# Altium PCB Industrial_IOT_Dev_Brd-v2.0.PcbDoc (part 5 of 5)
Units mil, origin at the board's own origin, x right, y up, seen from the top; angles counter-clockwise.
Board outline 3543.31 x 4724.41 mil, 2 copper layers (Top Layer, Bottom Layer), stack 61.889 mil thick; 159 components, 96 nets, 479 pads, 141 vias.
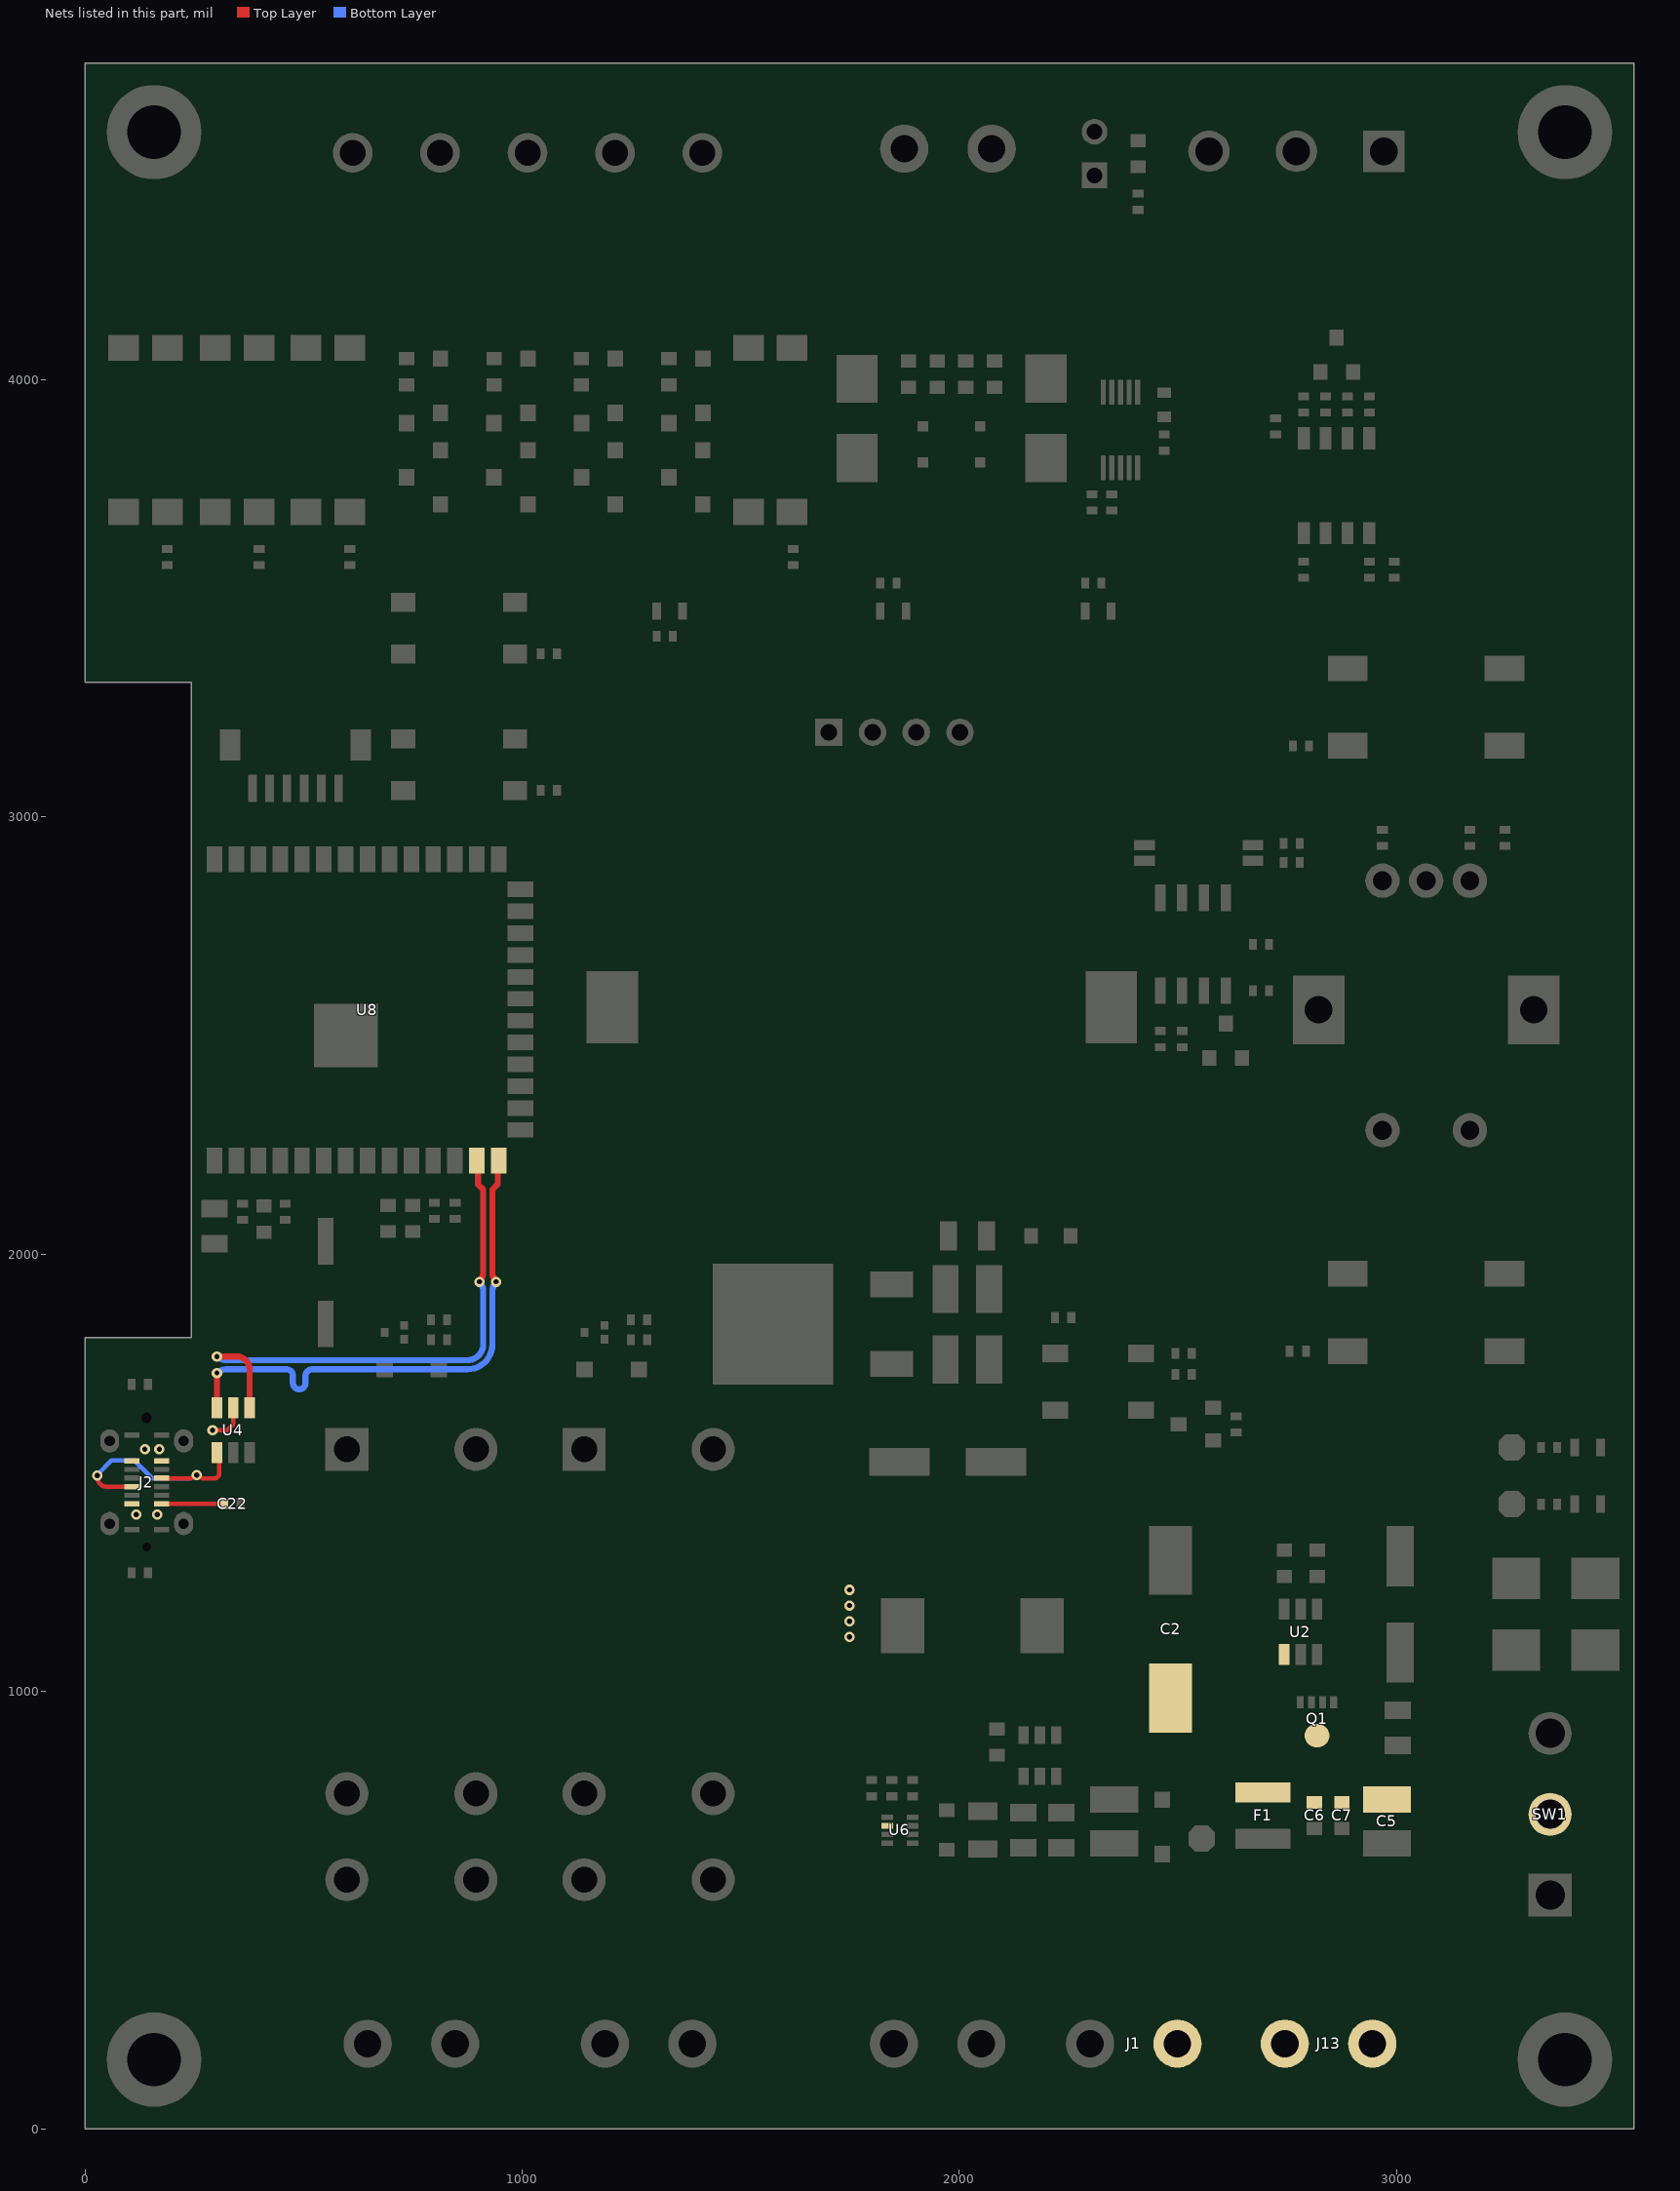
[diagram p3: the nets of this part, all layers, seen from the top]

## Via types
v1: diameter 23.62, hole 11.81, Top Layer to Bottom Layer, tented both sides, 141 vias

## Nets (pads, with @x,y where several pads share a name; then routed paths per layer and width w, separated by ;. In a path a pad name is that pad's centre, name@x,y a point inside that pad or via, vN(x,y) a via of type N, cw(c..) or ccw(c..) an arc to the next point about the centre after c; other vN are vias at no path point) (continued)
TYPEC_D_P: J2.A6 J2.B6 U4.1 | length 551
  Top Layer w10: v1(27.72,1494.02) 30.63,1480.38 ccw(c50.31,1489.14) 50.35,1467.6 53.59,1467.6 106.14,1467.6 J2.A6@106.97,1468.43 ; J2.B6@175.08,1488.11 ccw(c177.27,1490.3) 177.27,1487.2 189.02,1487.2 ccw(c190.07,1488.26) 190.07,1486.77 237.8,1486.77 ccw(c237.8,1500.96) 247.83,1490.92 249.38,1492.47 cw(c255.67,1486.18) v1(255.67,1495.08) cw(c255.67,1486.18) 261.96,1492.47 263.51,1490.92 ccw(c273.55,1500.96) 273.55,1486.77 294.45,1486.77 ccw(c294.45,1499.23) 306.91,1499.23 306.91,1540.48 U4.1@301.69,1545.69
  Bottom Layer w10: v1(27.72,1494.02) 27.72,1495.51 60.21,1528 112.6,1528 153.83,1486.77 237.8,1486.77 ccw(c237.8,1500.96) 247.83,1490.92 249.38,1492.47 cw(c255.67,1486.18) v1(255.67,1495.08)
TYPEC_N: U4.4 U8.13 | length 1242.5
  Top Layer w14: v1(301.69,1766) 347.19,1766 cw(c347.19,1736.69) 360.24,1762.93 cw(c347.19,1736.69) 373.43,1749.74 cw(c347.19,1736.69) 376.5,1736.69 U4.4@376.5,1648.84 ; U8.13@896.42,2214.66 898.82,2212.25 898.82,2159.82 910.67,2147.97 910.67,1956.41 cw(c889.42,1956.41) 904.45,1941.39 ccw(c908.89,1936.94) v1(902.6,1936.94)
  Bottom Layer w14: v1(301.69,1766) cw(c301.69,1759.71) 306.13,1764.16 ccw(c321.76,1779.78) 321.76,1757.69 452.42,1757.69 600,1757.69 874.64,1757.69 ccw(c874.64,1793.97) 910.92,1793.97 910.92,1916.88 ccw(c888.83,1916.88) 904.45,1932.5 cw(c908.89,1936.94) v1(902.6,1936.94)
TYPEC_P: U4.6 U8.14 | length 1242.3
  Top Layer w14: U4.6@301.69,1648.84 v1(301.69,1728.38) ; v1(940.23,1936.94) ccw(c933.94,1936.94) 938.39,1941.39 cw(c954.6,1957.6) 931.67,1957.6 931.67,2147.66 944.01,2160 944.01,2212.25 U8.14@946.42,2214.66
  Bottom Layer w14: v1(301.69,1728.38) ccw(c301.69,1734.66) 306.13,1730.21 cw(c321.76,1714.6) 321.76,1736.69 425,1736.69 461,1736.69 cw(c461,1722.19) 475.5,1722.19 475.5,1705.6 ccw(c490,1705.6) 504.5,1705.6 504.5,1722.19 cw(c519,1722.19) 519,1736.69 543.89,1736.69 874.64,1736.69 ccw(c874.64,1793.97) 931.92,1793.97 931.92,1916.88 cw(c954.01,1916.88) 938.39,1932.5 ccw(c933.94,1936.94) v1(940.23,1936.94)
VBUS-TYPEC: C22.1 J2.A4 J2.A9 J2.B4 J2.B9 U4.5 U6.6 | length 234.7
  Top Layer w10: J2.B9@175.08,1429.06 C22.1@318.63,1429.06 ; v1(291.69,1597.27) 325.74,1597.27 339.1,1610.63 U4.5@339.1,1648.84
  other v1: 1749.03,1124.37 1749.03,1160.37 1749.03,1196.37 1749.03,1232.37 116.97,1404.78 165.08,1404.78 136.97,1553.76 170.08,1553.76
VCC: J1.1 J13.1 J13.2 SW1.2
VIN: C2.1 C5.2 C6.2 C7.2 F1.1 Q1.5 U2.4
pads on no net: J2.A8 J2.B8 J2.MH J3.MP1 J3.MP2 LED5.2 SW1.1 U6.8 U8.15 U8.16 U8.17 U8.18 U8.19 U8.24 U8.25 U8.26 U8.28 U8.29 U8.30 U10.7 X1.2 X1.3

## Polygon pours and split planes (outlines as drawn)
5V on Top Layer "5V_L01_P130" (solid, pour order 130): 1773.72,1809.58 1773.72,1483.47 1794.2,1463 1931.99,1463 1952,1483.01 1952,1640.96 2007,1695.96 2007,1805.95 1985.95,1827 1791.15,1827
3V3 on Top Layer "3V3_L01_P136" (solid, pour order 136): 1240,3507.82 cw(c1260,3507.82) 1260,3527.82 1639.06,3527.82 ccw(c1639.06,3541.26) 1652.51,3541.26 1652.51,3572.7 ccw(c1640.21,3572.7) 1640.2,3585 175.7,3585 ccw(c175.7,3569.3) 160,3569.3 160,3544.34 ccw(c176.52,3544.34) 176.52,3527.82 1152.18,3527.82 cw(c1152.18,3500) 1180,3500 1180,3340 ccw(c1221.41,3340) 1221.41,3298.59 1732.91,3298.59 cw(c1732.91,3271.5) 1760,3271.5 1760,3162.44 ccw(c1778.5,3162.44) 1778.5,3143.94 1823.68,3143.94 ccw(c1823.68,3167.28) 1847.02,3167.28 1847.02,3333.42 ccw(c1819.88,3333.42) 1819.88,3360.56 1260,3360.56 cw(c1260,3380.56) 1240,3380.56
NetC9_2 on Top Layer "NETC9_2_L01_P114" (solid, pour order 114): 1820.99,874.78 1836.75,859.01 1942.16,858.84 2020.63,780.37 2020.64,702.76 2263.31,702.76 2263.31,746.76 2252.23,757.83 2182.8,757.83 2158.5,782.13 2158.5,825.2 2053.51,825.2 2020,858.71 2020,1239.55 2002.41,1257.14 1837.03,1257.14 1820.98,1241.09
3V3 on Top Layer "3V3_L01_P133" (solid, pour order 133): 2030,2077.53 2048.47,2096 2194,2096 2209.37,2080.63 2209.37,2013.3 2191.07,1995 2047.13,1995 2030,2012.13
GND on Top Layer "GND_L01_P132" (solid, remove dead copper, pour order 132): 0,1258.75 1720,1258.75 1720,94.29 3543.31,94.29 3543.31,4724.41 0,4724.41 0,3308.25 243.39,3308.25 243.39,1809.66 0,1809.66
NetC19_2 on Top Layer "NETC19_2_L01_P117" (solid, pour order 117): 1773.72,2077.38 1792.34,2096 1987.06,2096 2007,2076.06 2007,1873.29 1985.71,1852 1793.4,1852 1773.72,1871.67
NetC1_1 on Top Layer "NETC1_1_L01_P115" (solid, pour order 115): 2200,1257.14 2247.86,1257.14 2265,1240 2265,969.95 2252.23,957.18 2203.72,957.18 2195.91,949.37 2195.91,880.32 2172.28,880.32 2172.28,948.72 2163.82,957.18 2114.59,957.18 2101,970.77 2101,1239 2119.14,1257.14
24V on Top Layer "24V_L01_P113" (solid, pour order 113): 2299.1,757.83 2285,771.93 2173.52,771.93 2172.28,773.16 2172.28,825.2 2303.2,825.2 2314.78,836.78 2576.22,836.78 2595.56,817.44 2595.56,721.35 2621.79,695.12 2755.54,695.12 2765.1,685.56 2765.1,618.2 2756.18,609.29 2514,609.29 2503,620.29 2503,706.1 2486.34,722.76 2299.1,722.76
NetC3_1 on Top Layer "NETC3_1_L01_P112" (solid, pour order 112): 2856.53,1159.29 2856.53,1287.96 2836.24,1308.25 2725.84,1308.25 2725.84,1353 2901.42,1353 2924.42,1330 2924.42,1175.58 2942,1157.9 3346.82,1157.9 3368,1136.72 3368,995 3427,936 3427,815 3408.12,796.12 3165.88,796.12 3149,813 3149,917 3129,937 2929.61,937 2905.2,961.41 2797.08,961.41 2797.08,1051.81 2805.94,1060.67 2805.94,1108.7
VIN on Top Layer "VIN_L01_P111" (solid, pour order 111): 2755.55,1108.7 2408.7,1108.7 2387,1087 2387,875 2404,858 2600.91,858 2616,842.91 2616,731.11 2631.1,716.01 3050.07,716.01 3065.07,731.01 3065.07,788.93 3049,805 2927.65,805 2913,819.65 2913,920 2896,937 2765.95,937 2755.55,947.4
3V3 on Bottom Layer "3V3_L02_P134" (solid, pour order 134): 2600,1657.79 2600,1632.54 ccw(c2630.9,1632.54) 2630.9,1601.64 3274.04,1601.64 cw(c3274.04,1582.5) 3293.01,1579.95 3293.68,1530.03 cw(c3273.92,1529.77) 3273.91,1510 2557.43,1510 cw(c2557.43,1547.08) 2520.36,1547.08 2520.36,1944.64 ccw(c2465,1944.64) 2465,2000 319.8,2000 cw(c319.8,2054.8) 265,2054.8 265,3357 265,3500 265,3582.72 cw(c297.28,3582.72) 297.28,3615 335,3615 cw(c335,3585.87) 364.13,3585.87 364.13,2155.34 ccw(c423.47,2155.33) 423.47,2096 2574,2096 cw(c2574,2070) 2600,2070
VBUS-TYPEC on Bottom Layer "VBUS-TYPEC_L02_P124" (solid, pour order 124): 94,1349.04 ccw(c123.87,1349.04) 123.87,1319.17 1685.98,1319.17 cw(c1685.98,1285.15) 1720,1285.15 1720,1087 1779,1087 1779,1405 ccw(c1740,1405) 1740,1444 415,1444 338.9,1444.21 cw(c338.9,1469.22) 313.9,1469.22 313.9,1503.06 313.9,1616.93 ccw(c297.77,1616.93) 297.77,1633.06 112.72,1633.06 ccw(c112.72,1614.34) 94,1614.34
GND on Bottom Layer "GND_L02_P131" (solid, remove dead copper, pour order 131): 78.01,1330.4 78.01,1546.18 0,1546.18 0,1809.66 243.39,1809.66 243.39,3308.25 0,3308.25 0,4724.41 3543.31,4724.41 3543.31,814.95 3540.82,817.44 2455.8,817.44 2408.61,770.25 2408.61,94.29 1720,94.29 1720,1275.84 1665.44,1330.4
5V on Bottom Layer "5V_L02_P126" (solid, pour order 126): 2236,1814 2281,1814 2296.36,1814 cw(c2296.36,1780.36) 2330,1780.36 2330,1640.63 cw(c2297.13,1640.63) 2297.13,1607.77 2242.77,1607.77 1999.77,1607.77 ccw(c1999.77,1559) 1951,1559 1951,1055 1951,1007 1951,933.39 1860,842.39 1860,573 cw(c1820,573) 1820,533 1762,533 cw(c1762,572) 1723,572 1723,1066.45 1786.45,1066.45 ccw(c1786.45,1079.42) 1799.42,1079.42 1799.3,1174.63 1799.3,1254.74 1799.3,1411.18 ccw(c1747.31,1411.18) 1747.31,1463.17 ccw(c1749.22,1415.12) 1744.79,1463 817,1463 cw(c817,1505) 775,1505 775,1610 cw(c813.02,1610) 813.03,1648.03 1002.03,1648.03 1168,1814
VCC on Bottom Layer "VCC_L02_P110" (solid, pour order 110): 3483.89,796.12 cw(c3483.89,760) 3520,760 3520,660 cw(c3488.83,660) 3488.83,628.83 3445.83,628.83 3084.83,628.83 ccw(c3084.83,589.31) 3045.31,589.31 3045.31,155.31 cw(c2986.93,155.31) 2986.92,96.92 2489.35,96.92 cw(c2488.04,155.96) 2429,154.64 2429,738.77 cw(c2486.34,738.77) 2486.34,796.12

## Other copper
Top Layer:
  rectangle net NetC1_1: 2172.28,880.32 2195.91,949.37
  rectangle net NetR1_2: 2291.24,3769.84 2329.09,3826.93
  rectangle net LED: 2562.26,1620.64 2654.89,1700
  rectangle net 3V3: 2562.26,1535 2654.89,1601.64
  rectangle net NetC9_2: 2045,810 2153.11,825.2
  rectangle net 5V: 1821.97,666.62 1906.22,679.22
  region net VBUS-TYPEC: 192.21,1434.96 89.84,1434.96 89.84,1404.01 192.21,1404.01
  rectangle net VBUS-TYPEC: 89.84,1521.58 192.21,1538.02
  rectangle net NetR17_1: 1884.59,712.29 1900.9,761.5
  rectangle net NetC9_2: 2020.63,702.76 2263.31,742.76
  rectangle net NetC3_1: 2725.84,1308.25 2836.24,1338.25
  rectangle net NetC17_1: 2805.94,1163.82 2830.35,1263.25
  rectangle net NetR6_2: 2731.14,1163.82 2755.54,1263.25
  rectangle net NetD1_1: 3424.23,1073 3487,1274
  rectangle net NetC3_1: 2805.94,961.41 2864.79,1108.7
  rectangle net VIN: 2717,937 2755.55,1108.7
  rectangle net NetQ1_4: 2771.49,961.41 2788.02,1084.69
  rectangle net 3V3: 2452.72,3865.91 2484.21,3927.25
  rectangle net 3V3-FIL: 2407.84,3958.75 2484.21,3982.37
  region net VBUS-TYPEC: 1765.03,1256.77 1771.62,1250.19 1771.62,1232.37 1771.62,713.63 1786.35,698.9 1848.35,698.9 1848.35,686.31 1732.4,686.31 1726.44,692.26 1726.44,1250.73 1732.49,1256.77
  region net 24V: 2303.2,825.2 2172.28,825.2 2172.28,785.83 2186.51,771.61 2284.68,771.61 2303.2,790.13
  region net NetC9_2: 2158.5,825.2 2158.5,780.4 2181.07,757.83 2252.23,757.83 2263.31,746.76 2263.31,702.76 2020.63,702.76 2020.63,780.37 2053.51,825.2
  region net 3V3: 363.7,2170.13 372.62,2170.13 372.62,2106.5 326.42,2106.5 326.42,2084 266.42,2084 266.42,2170.13 329.13,2170.13 329.13,2300 363.7,2300
  region net RLY1_COM: 928,643 932.83,643 942.29,641.12 951.21,637.42 959.24,632.06 966.06,625.24 971.42,617.21 975.12,608.29 976.49,601.37 977,594 977,425 976.9,419.68 974.63,409.29 970.38,399.53 964.31,390.8 956.65,383.42 947.69,377.67 937.79,373.78 929.85,372.36 922,372 791.45,372 787.05,371.78 778.42,370.07 770.3,366.7 762.98,361.81 756.76,355.59 751.87,348.27 748.5,340.15 746.79,331.52 746.57,327.12 746.57,221 746.57,148.91 746.57,143.54 744.47,132.98 740.35,123.04 734.38,114.1 726.77,106.49 717.82,100.51 707.88,96.39 697.33,94.29 691.95,94.29 570.47,94.29 560.3,96.32 550.71,100.29 542.09,106.05 534.76,113.38 528.99,122.01 525.02,131.59 523,141.76 523,146.95 523,601.88 523,605.93 524.58,613.87 527.68,621.36 532.18,628.09 537.91,633.82 544.64,638.32 552.13,641.42 560.07,643 564.12,643
  region net RLY2_COM: 1470.62,643 1475.44,643 1484.91,641.12 1493.83,637.42 1501.85,632.06 1508.68,625.24 1514.04,617.21 1517.73,608.29 1519.11,601.37 1519.62,594 1519.62,425 1519.52,419.68 1517.25,409.29 1513,399.53 1506.92,390.8 1499.26,383.42 1490.31,377.67 1480.41,373.78 1472.47,372.36 1464.62,372 1334.07,372 1329.67,371.78 1321.04,370.07 1312.91,366.7 1305.6,361.81 1299.38,355.59 1294.49,348.27 1291.12,340.15 1289.41,331.52 1289.19,327.12 1289.19,221 1289.19,148.91 1289.19,143.54 1287.09,132.98 1282.97,123.04 1276.99,114.1 1269.39,106.49 1260.44,100.51 1250.5,96.39 1239.95,94.29 1234.57,94.29 1113.09,94.29 1102.92,96.32 1093.33,100.29 1084.71,106.05 1077.37,113.38 1071.61,122.01 1067.64,131.59 1065.62,141.76 1065.62,146.95 1065.62,601.88 1065.62,605.93 1067.2,613.87 1070.3,621.36 1074.8,628.09 1080.53,633.82 1087.26,638.32 1094.74,641.42 1102.69,643 1106.74,643
  region net 5V: 1806.97,631.94 1870.33,631.94 1870.33,629.49 1870.33,628.89 1872.08,620.11 1877.05,612.67 1877.3,612.42 1884.74,607.45 1893.52,605.71 1902.3,607.45 1909.74,612.42 1914.71,619.87 1915.95,626.12 1921.22,631.94 1921.22,665.91 1936.25,665.91 1936.25,569.51 1928.74,562 1737,562 1726.44,572.56 1726.44,660.54 1731.68,665.27 1732.47,665.91 1806.97,665.91
  region net 5V: 1796.71,679.22 1731.68,679.22 1726.44,673.98 1726.44,610 1733.44,603 1796.73,603 1806.97,613.24 1806.97,660.7 1812.89,666.62 1835.16,666.62 1835.16,679.22
  region net 5V: 1881.95,679.22 1928.74,679.22 1942,665.96 1942,575.26 1928.74,562 1918.19,572.56 1916.07,572.56 1916.07,660.51 1909.97,666.62 1879.84,666.62 1881.95,668.73
  region net VBUS-TYPEC: 147.95,1432.83 192.21,1432.83 192.21,1401.54 192.21,1399 190.26,1394.31 186.67,1390.72 181.98,1388.78 103.14,1388.78 100.5,1388.78 95.61,1390.8 91.87,1394.55 89.84,1399.43 89.84,1428.98 93.1,1432.83 134.1,1432.83 134.1,1434.96 147.95,1434.96
  region net VBUS-TYPEC: 186.44,1565.73 190.18,1561.99 192.21,1557.1 192.21,1526.53 189.38,1523.7 147.95,1523.7 147.95,1521.58 134.1,1521.58 134.1,1523.7 89.84,1523.7 89.84,1555 89.84,1557.54 91.79,1562.23 95.38,1565.82 100.06,1567.76 178.91,1567.76 181.55,1567.76
  region net 5V-PWR: 1936.25,686.31 1953.38,669.18 1953.38,614.74 1965.12,603 2095,603 2101.1,609.1 2101.1,675.33 2090.12,686.31 1979.71,686.31 1967.11,698.9 1876.43,698.9 1864.1,711.24 1864.1,763.19 1858.28,769 1787,769 1780,762 1780,716.32 1790.33,705.99 1851.62,705.99 1871.3,686.31
  region: 3543.31,4501.18 3543.31,4724.41 3320.08,4724.41 ccw(c3385.46,4566.56) 3214.61,4566.56 ccw(c3385.46,4566.56) 3385.46,4395.71 ccw(c3385.46,4566.56)
  region: 223.23,4724.41 0,4724.41 0,4501.18 ccw(c157.85,4566.56) 157.85,4395.71 ccw(c157.85,4566.56) 328.7,4566.56 ccw(c157.85,4566.56)
  region: 0,223.23 0,0 223.23,0 ccw(c157.85,157.85) 328.7,157.85 ccw(c157.85,157.85) 157.85,328.7 ccw(c157.85,157.85)
  region: 3320.08,0 3543.31,0 3543.31,223.23 ccw(c3385.46,157.85) 3385.46,328.7 ccw(c3385.46,157.85) 3214.61,157.85 ccw(c3385.46,157.85)
Bottom Layer:
  region net RLY2_NO: 1545.74,857.73 1556.48,853.29 1566.13,846.83 1574.35,838.62 1580.8,828.96 1585.25,818.23 1587.52,806.83 1587.52,801.02 1587.52,148.52 1587.51,148.52 1587.51,143.24 1585.46,132.91 1581.42,123.17 1575.57,114.4 1568.11,106.95 1559.35,101.09 1549.61,97.06 1539.27,95 1534,95 1402.04,94.29 1359.78,94.29 1356.15,94.29 1349.05,95.71 1342.36,98.48 1336.33,102.5 1331.21,107.63 1327.19,113.65 1324.41,120.34 1323,127.45 1323,131.07 1323,287.19 1322.84,290.5 1321.54,297 1319.01,303.13 1315.33,308.64 1310.64,313.33 1305.13,317.01 1299,319.54 1292.5,320.84 1289.19,321 1259.48,321 1182.99,320.85 1175.44,320.84 1167.57,321.82 1166.82,321.97 1161.45,324.2 1156.61,327.43 1152.49,331.55 1149.26,336.38 1147.03,341.76 1145.9,347.47 1145.9,480.74 1150.26,480.74 1167.38,484.15 1183.5,490.82 1198.01,500.52 1210.34,512.86 1220.04,527.37 1226.72,543.49 1230.12,560.6 1230.12,578.05 1226.72,595.16 1220.04,611.29 1210.34,625.79 1198.01,638.13 1183.5,647.83 1167.38,654.5 1150.26,657.91 1132.81,657.91 1114.38,657.91 1109.55,657.81 1100.04,659.51 1091.04,663.04 1082.9,668.25 1075.94,674.95 1070.42,682.88 1066.55,691.73 1064.48,701.17 1064.38,706 1064.38,815.23 1066.29,824.82 1070.04,833.86 1075.47,841.99 1082.39,848.91 1090.52,854.35 1099.56,858.09 1109.16,860 1534.35,860 hole: 1445.56,657.91 1428.11,657.91 1411,654.5 1394.88,647.83 1380.37,638.13 1368.03,625.79 1358.34,611.29 1351.66,595.16 1348.25,578.05 1348.25,560.6 1351.66,543.49 1358.34,527.37 1368.03,512.86 1380.37,500.52 1394.88,490.82 1411,484.15 1428.11,480.74 1445.56,480.74 1462.68,484.15 1478.8,490.82 1493.31,500.52 1505.64,512.86 1515.34,527.37 1522.02,543.49 1525.42,560.6 1525.42,578.05 1522.02,595.16 1515.34,611.29 1505.64,625.79 1493.31,638.13 1478.8,647.83 1462.68,654.5
  region net RLY1_NO: 924.67,860 929.06,860 937.67,858.29 945.78,854.93 953.08,850.05 959.29,843.85 964.16,836.55 967.52,828.44 968.64,822.81 969.23,815.44 969.23,686.36 968.02,680.27 965.64,674.52 962.19,669.35 957.79,664.96 952.62,661.5 946.88,659.12 940.78,657.91 835.96,657.91 832.99,657.76 827.16,656.6 821.67,654.33 816.72,651.03 812.52,646.82 809.22,641.88 806.94,636.39 805.78,630.56 805.64,627.59 805.64,557.47 805.64,503.36 806.1,498.64 809.72,489.9 816.41,483.21 825.14,479.6 829.87,479.13 930.87,479.13 934.65,479.13 942.06,477.66 949.04,474.76 955.33,470.57 960.67,465.22 964.87,458.94 967.76,451.96 968.5,448.23 969.23,440.77 969.23,161.84 969.23,155.19 966.64,142.14 961.55,129.84 954.15,118.78 944.75,109.37 933.68,101.98 921.39,96.89 908.34,94.29 901.69,94.29 817.16,94.29 810.21,94.29 796.57,97.01 783.72,102.33 772.16,110.05 762.33,119.88 754.6,131.45 749.28,144.29 746.57,157.93 746.57,164.88 746.57,220.42 746.57,284.92 746.27,291.1 743.85,303.23 739.12,314.66 732.25,324.94 723.51,333.68 713.23,340.55 701.8,345.28 690.86,347.46 689.68,347.7 683.5,348 683.49,348 496.71,348 486.32,350.07 476.54,354.12 467.73,360 460.24,367.49 454.36,376.29 450.31,386.08 448.24,396.46 448.24,401.76 448.24,815.23 448.24,819.64 449.96,828.29 453.34,836.43 458.24,843.77 464.47,850 471.81,854.9 479.95,858.28 488.6,860 493.01,860 hole: 607.64,657.91 590.19,657.91 573.08,654.5 556.96,647.83 542.45,638.13 530.11,625.79 520.42,611.29 513.74,595.16 510.34,578.05 510.34,560.6 513.74,543.49 520.42,527.37 530.11,512.86 542.45,500.52 556.96,490.82 573.08,484.15 590.19,480.74 607.64,480.74 624.76,484.15 640.88,490.82 655.39,500.52 667.73,512.86 677.42,527.37 684.1,543.49 687.5,560.6 687.5,578.05 684.1,595.16 677.42,611.29 667.73,625.79 655.39,638.13 640.88,647.83 624.76,654.5
  pour cut-out: 1052.95,569.33 ccw(c1141.54,569.33) 1141.54,480.74 ccw(c1141.54,569.33) 1230.12,569.33 ccw(c1141.54,569.33) 1141.54,657.91 ccw(c1141.54,569.33)
  pour cut-out: 1348.25,569.33 ccw(c1436.84,569.33) 1436.84,480.74 ccw(c1436.84,569.33) 1525.42,569.33 ccw(c1436.84,569.33) 1436.84,657.91 ccw(c1436.84,569.33)
  pour cut-out: 510.34,569.33 ccw(c598.92,569.33) 598.92,480.74 ccw(c598.92,569.33) 687.5,569.33 ccw(c598.92,569.33) 598.92,657.91 ccw(c598.92,569.33)
  region: 3543.31,4501.18 3543.31,4724.41 3320.08,4724.41 ccw(c3385.46,4566.56) 3214.61,4566.56 ccw(c3385.46,4566.56) 3385.46,4395.71 ccw(c3385.46,4566.56)
  region: 223.23,4724.41 0,4724.41 0,4501.18 ccw(c157.85,4566.56) 157.85,4395.71 ccw(c157.85,4566.56) 328.7,4566.56 ccw(c157.85,4566.56)
  region: 0,223.23 0,0 223.23,0 ccw(c157.85,157.85) 328.7,157.85 ccw(c157.85,157.85) 157.85,328.7 ccw(c157.85,157.85)
  region: 3320.08,0 3543.31,0 3543.31,223.23 ccw(c3385.46,157.85) 3385.46,328.7 ccw(c3385.46,157.85) 3214.61,157.85 ccw(c3385.46,157.85)
Multi-Layer:
  pour cut-out: 3543.05,4724.41 3228.11,4724.41 3227.61,4724.9 ccw(c3384.96,4567.55) 3162.43,4567.55 ccw(c3384.97,4567.55) 3384.97,4345.02 ccw(c3391.05,4552.36) 3538.62,4406.58 3543.54,4423.32
  pour cut-out: 0,4724.15 0,4409.21 -0.49,4408.71 ccw(c156.86,4566.07) 156.86,4343.53 ccw(c156.86,4566.07) 379.39,4566.07 ccw(c172.05,4572.15) 317.83,4719.72 301.09,4724.64
  pour cut-out: 0.26,0 315.2,0 315.7,-0.49 ccw(c158.34,156.86) 380.88,156.86 ccw(c158.34,156.86) 158.34,379.39 ccw(c152.26,172.05) 4.69,317.83 -0.23,301.09
  pour cut-out: 1639.51,1232.37 cw(c1639.51,1151.88) 1720,1151.88 1720,0 100,0 cw(c100,100) 0,100 0,1232.37
  pour cut-out: 3543.31,0.26 3543.31,315.2 3543.8,315.7 ccw(c3386.45,158.34) 3386.45,380.87 ccw(c3386.45,158.34) 3163.92,158.34 ccw(c3371.26,152.26) 3225.48,4.69 3242.22,-0.23

## Silkscreen, mask and mechanical layers (free items; w line width, h text height)
Top Overlay:
  lines w5: 2966.54,3944.15 3030,3944.15 ; 2760,3901.91 2966.54,3901.91 2966.54,3986.38 2760,3986.38 2760,3901.91 ; 3030,3875 3240,3875 3240,4010 3030,4010 3030,3875
  text "D3" at 1068.9,4306.58 h78.74 r180
  text "GND" at 2656.35,4306.58 h78.74 r180
  text "GND" at 689.96,4305.93 h78.74 r180
  text "D4" at 869.48,4305.93 h78.74 r180
  text "D2" at 1264.31,4305.93 h78.74 r180
  text "D1" at 1464.31,4305.93 h78.74 r180
  text "A2" at 1902.62,4305.93 h78.74 r180
  text "A1" at 2160.61,4305.93 h78.74 r180
  text "B" at 2829.7,4305.93 h78.74 r180
  text "A" at 3027.69,4305.93 h78.74 r180
  text "DIGITAL INPUT" at 1464.31,4220.65 h100 r180
  text "ANALOG" at 2160.61,4219.57 h100 r180
  text "RS-485" at 3027.69,4219.57 h100 r180
  text "RESET" at 700.41,3539.48 h78.74
  text "RL2" at 2122.97,3438.7 h78.74
  text "PWR" at 1117.22,3437.61 h78.74
  text "RL1" at 1658.54,3438.21 h78.74
  text "OLED" at 1636.5,3271.17 h78.74
  text "VOLTLINK" at 309.73,3227.37 h78.74
  text "BOOT" at 700.32,3227.37 h78.74
  text "SELECT" at 2911.4,3039.8 h78.74
  text "ENCODER" at 2831.51,2153.44 h78.74
  text "BACK" at 2910.29,1651.49 h78.74
  text "RGB" at 2211.9,1524.22 h78.74
  text "3V3" at 3055.28,1521.89 h78.74
  text "5V0" at 3054.85,1394.32 h78.74
  text "24V" at 2574.4,733.15 h78.74 r90
  text "CAUTION" at 166.08,533.74 h120 r90
  text "DC POWER IN" at 1783.01,498.74 h100
  text "POWER SW" at 3184.61,463.83 h78.74 r90
  text "HIGH VOLTAGE" at 267.81,431.41 h120 r90
  text "GND" at 1787.5,427.25 h78.74
  text "GND" at 1987.5,427.25 h78.74
  text "GND" at 2236.1,427.25 h78.74
  text "COM" at 545.78,414.59 h78.74
  text "NO1" at 774.78,414.59 h78.74
  text "COM" at 1088.4,414.59 h78.74
  text "NO2" at 1312.73,414.59 h78.74
  text "24V" at 2428.64,414.59 h78.74
  text "24V" at 2674.27,414.59 h78.74
  text "24V" at 2874.27,414.59 h78.74
Bottom Overlay:
  drawing of 2 lines, arcs and shapes, not listed
  text "CAUTION" at 1108.36,1143.92 h120
  text "HIGH VOLTAGE" at 1210.69,1042.19 h120
  text "Rev-v2.0" at 40.04,605.07 h60 r270
  text "IOT-DEV-BOARD" at 143.13,457.12 h60 r270
Board Outline:
  lines w5: 446.42,2903.63 496.42,2903.63 ; 0,1809.66 0,0 3543.31,0 3543.31,4724.41 0,4724.41 0,3308.25 243.39,3308.25 243.39,1809.66 0,1809.66 ; 0,1809.66 0,1809.66
  lines w7: 361.62,517.71 ccw(c381.64,517.71) 381.64,497.69 ccw(c381.64,517.71) 401.65,517.71 401.65,845.5 cw(c489.4,845.5) 489.4,933.25 517.85,933.25 ccw(c517.85,952.93) 537.53,952.93 ccw(c517.19,952.93) 517.19,973.28 489.4,973.28 ccw(c489.4,845.5) 361.62,845.5 361.62,517.71 ; 1498.22,952.93 ccw(c1517.91,952.93) 1517.91,933.25 1546.35,933.25 cw(c1546.35,845.5) 1634.1,845.5 1634.1,94.01 ccw(c1654.12,94.01) 1654.12,73.99 ccw(c1654.12,94.01) 1674.13,94.01 1674.13,845.5 ccw(c1546.35,845.5) 1546.35,973.28 1518.57,973.28 ccw(c1518.57,952.93) 1498.22,952.93
  lines w10: 599.53,953.51 ccw(c619.55,953.51) 619.55,933.5 949.22,933.5 ccw(c949.22,953.51) 969.23,953.51 ccw(c949.22,953.51) 949.22,973.53 619.55,973.53 ccw(c619.55,953.51) 599.53,953.51 ; 1066.52,953.51 ccw(c1086.54,953.51) 1086.54,933.5 1416.21,933.5 ccw(c1416.21,953.51) 1436.22,953.51 ccw(c1416.21,953.51) 1416.21,973.53 1086.54,973.53 ccw(c1086.54,953.51) 1066.52,953.51
Fabrication:
  drawing of 191 lines, arcs and shapes, not listed
  text "Layer" at 4510.09,4695 h60
  text "Name" at 4920,4695 h60
  text "Material" at 5849.74,4695 h60
  text "Thickness" at 6409.61,4695 h60
  text "Constant" at 7059.44,4695 h60
  text "Board Layer Stack" at 7629.3,4695 h60
  text "Top Overlay" at 4920,4575 h60
  text "Top Solder" at 4920,4455 h60
  text "SM-001" at 5849.74,4455 h60
  text "0.025mm" at 6409.61,4455 h60
  text "4.8" at 7059.44,4455 h60
  text "1" at 4510.09,4335 h60
  text "Top Layer" at 4920,4335 h60
  text "0.036mm" at 6409.61,4335 h60
  text "Dielectric 1" at 4920,4215 h60
  text "FR-4" at 5849.74,4215 h60
  text "1.500mm" at 6409.61,4215 h60
  text "4.8" at 7059.44,4215 h60
  text "2" at 4510.09,4095 h60
  text "Bottom Layer" at 4920,4095 h60
  text "0.036mm" at 6409.61,4095 h60
  text "Bottom Solder" at 4920,3975 h60
  text "SM-001" at 5849.74,3975 h60
  text "0.025mm" at 6409.61,3975 h60
  text "4.8" at 7059.44,3975 h60
  text "Bottom Overlay" at 4920,3855 h60
  text "Total board thickness:" at 4510.09,3735 h60
  text "1.623mm" at 6409.61,3735 h60
Drill Drawing:
  circle w10: c-2627.39,7403.33 r33.33
  lines w10: -2660.72,6036.67 -2644.06,6036.67 -2644.06,6020 -2610.72,6020 -2610.72,6036.67 -2594.06,6036.67 -2594.06,6070 -2610.72,6070 -2610.72,6086.67 -2644.06,6086.67 -2644.06,6070 -2660.72,6070 -2660.72,6036.67 ; -2660.72,6170 -2660.72,6186.67 -2644.06,6203.33 -2660.72,6220 -2660.72,6236.67 -2644.06,6236.67 -2627.39,6220 -2610.72,6236.67 -2594.06,6236.67 -2594.06,6220 -2610.72,6203.33 -2594.06,6186.67 -2594.06,6170 -2610.72,6170 -2627.39,6186.67 -2644.06,6170 -2660.72,6170 ; -2660.72,6320 -2594.06,6320 -2594.06,6386.67 -2660.72,6386.67 -2660.72,6320 ; -2660.72,6536.67 -2594.06,6536.67 -2627.39,6470 -2660.72,6536.67 ; -2660.72,6620 -2594.06,6620 -2594.06,6686.67 -2660.72,6686.67 -2660.72,6620 ; -2660.72,6786.67 -2644.06,6786.67 -2627.39,6770 -2610.72,6786.67 -2594.06,6786.67 -2610.72,6803.33 -2594.06,6820 -2610.72,6820 -2627.39,6836.67 -2644.06,6820 -2660.72,6820 -2644.06,6803.33 -2660.72,6786.67 ; -2660.72,6920 -2627.39,6936.67 -2594.06,6920 -2610.72,6953.33 -2594.06,6986.67 -2627.39,6970 -2660.72,6986.67 -2644.06,6953.33 -2660.72,6920 ; -2660.72,7253.33 -2627.39,7220 -2594.06,7253.33 -2627.39,7286.67 -2660.72,7253.33 ; -2660.72,7536.67 -2644.06,7536.67 -2627.39,7520 -2610.72,7536.67 -2594.06,7536.67 -2610.72,7553.33 -2594.06,7570 -2610.72,7570 -2627.39,7586.67 -2644.06,7570 -2660.72,7570 -2644.06,7553.33 -2660.72,7536.67 ; -2660.72,7686.67 -2644.06,7686.67 -2644.06,7670 -2610.72,7670 -2610.72,7686.67 -2594.06,7686.67 -2594.06,7720 -2610.72,7720 -2610.72,7736.67 -2644.06,7736.67 -2644.06,7720 -2660.72,7720 -2660.72,7686.67 ; -2647.39,6043.33 -2637.39,6043.33 -2637.39,6033.33 -2617.39,6033.33 -2617.39,6043.33 -2607.39,6043.33 -2607.39,6063.33 -2617.39,6063.33 -2617.39,6073.33 -2637.39,6073.33 -2637.39,6063.33 -2647.39,6063.33 -2647.39,6043.33 ; -2647.39,6633.33 -2607.39,6633.33 -2607.39,6673.33 -2647.39,6673.33 -2647.39,6633.33 ; -2647.39,6793.33 -2637.39,6793.33 -2627.39,6783.33 -2617.39,6793.33 -2607.39,6793.33 -2617.39,6803.33 -2607.39,6813.33 -2617.39,6813.33 -2627.39,6823.33 -2637.39,6813.33 -2647.39,6813.33 -2637.39,6803.33 -2647.39,6793.33
  lines w15: -2720.51,5975 8390.38,5975 ; -2720.51,7775 8390.38,7775 ; -2169.64,5825 -2169.64,7925 ; -1579.79,5825 -1579.79,7925 ; -440.13,5825 -440.13,7925 ; 65.75,5825 65.75,7925 ; 799.55,5825 799.55,7925 ; 2299.1,5825 2299.1,7925 ; 2888.95,5825 2888.95,7925 ; 3634.75,5825 3634.75,7925 ; 4824.4,5825 4824.4,7925 ; 5678.16,5825 5678.16,7925 ; 7011.77,5825 7011.77,7925 ; -2720.51,5825 8390.38,5825 8390.38,7925 -2720.51,7925 -2720.51,5825
  text "Symbol" at -2630.51,7820 h72
  text "Count" at -2124.64,7820 h72
  text "Hole Size" at -1534.79,7820 h72
  text "Plated" at -395.13,7820 h72
  text "Hole Type" at 110.75,7820 h72
  text "Drill Layer Pair" at 844.55,7820 h72
  text "Via/Pad" at 2344.1,7820 h72
  text "Pad Shape" at 2933.95,7820 h72
  text "Template" at 3679.75,7820 h72
  text "Description" at 4869.4,7820 h72
  text "Hole Tolerance (+)" at 5723.16,7820 h72
  text "Hole Tolerance (-)" at 7056.77,7820 h72
  text "1" at -2124.64,7670 h60
  text "20.47mil (0.520mm)" at -1534.79,7670 h60
  text "NPTH" at -395.13,7670 h60
  text "Round" at 110.75,7670 h60
  text "Top Layer - Bottom Layer" at 844.55,7670 h60
  text "Pad" at 2344.1,7670 h60
  text "Rounded" at 2933.95,7670 h60
  text "c0hn52" at 3679.75,7670 h60
  text "1" at -2124.64,7520 h60
  text "23.62mil (0.600mm)" at -1534.79,7520 h60
  text "NPTH" at -395.13,7520 h60
  text "Slot" at 110.75,7520 h60
  text "Top Layer - Bottom Layer" at 844.55,7520 h60
  text "Pad" at 2344.1,7520 h60
  text "Rounded" at 2933.95,7520 h60
  text "c0hn60_72" at 3679.75,7520 h60
  text "2" at -2124.64,7370 h60
  text "35.43mil (0.900mm)" at -1534.79,7370 h60
  text "PTH" at -395.13,7370 h60
  text "Round" at 110.75,7370 h60
  text "Top Layer - Bottom Layer" at 844.55,7370 h60
  text "Pad" at 2344.1,7370 h60
  text "(Mixed)" at 2933.95,7370 h60
  text "(Mixed)" at 3679.75,7370 h60
  text "2" at -2124.64,7220 h60
  text "62.99mil (1.600mm)" at -1534.79,7220 h60
  text "PTH" at -395.13,7220 h60
  text "Rectangle" at 110.75,7220 h60
  text "Top Layer - Bottom Layer" at 844.55,7220 h60
  text "Pad" at 2344.1,7220 h60
  text "Rectangle" at 2933.95,7220 h60
  text "(Mixed)" at 3679.75,7220 h60
  text "3" at -2124.64,7070 h60
  text "66.93mil (1.700mm)" at -1534.79,7070 h60
  text "PTH" at -395.13,7070 h60
  text "Round" at 110.75,7070 h60
  text "Top Layer - Bottom Layer" at 844.55,7070 h60
  text "Pad" at 2344.1,7070 h60
  text "(Mixed)" at 2933.95,7070 h60
  text "(Mixed)" at 3679.75,7070 h60
  text "C" at -2659.6,7060.01 h66.67
  text "4" at -2124.64,6920 h60
  text "23.62mil (0.600mm)" at -1534.79,6920 h60
  text "PTH" at -395.13,6920 h60
  text "Slot" at 110.75,6920 h60
  text "Top Layer - Bottom Layer" at 844.55,6920 h60
  text "Pad" at 2344.1,6920 h60
  text "Rounded" at 2933.95,6920 h60
  text "r135_110h60_85r55" at 3679.75,6920 h60
  text "4" at -2124.64,6770 h60
  text "37.40mil (0.950mm)" at -1534.79,6770 h60
  text "PTH" at -395.13,6770 h60
  text "Round" at 110.75,6770 h60
  text "Top Layer - Bottom Layer" at 844.55,6770 h60
  text "Pad" at 2344.1,6770 h60
  text "(Mixed)" at 2933.95,6770 h60
  text "(Mixed)" at 3679.75,6770 h60
  text "4" at -2124.64,6620 h60
  text "122.05mil (3.100mm)" at -1534.79,6620 h60
  text "PTH" at -395.13,6620 h60
  text "Round" at 110.75,6620 h60
  text "Top Layer - Bottom Layer" at 844.55,6620 h60
  text "Pad" at 2344.1,6620 h60
  text "Rounded" at 2933.95,6620 h60
  text "c550h310" at 3679.75,6620 h60
  text "5" at -2124.64,6470 h60
  text "43.31mil (1.100mm)" at -1534.79,6470 h60
  text "PTH" at -395.13,6470 h60
  text "Round" at 110.75,6470 h60
  text "Top Layer - Bottom Layer" at 844.55,6470 h60
  text "Pad" at 2344.1,6470 h60
  text "Rounded" at 2933.95,6470 h60
  text "c200h110m210mx210p0" at 3679.75,6470 h60
  text "15" at -2124.64,6320 h60
  text "62.99mil (1.600mm)" at -1534.79,6320 h60
  text "PTH" at -395.13,6320 h60
  text "Round" at 110.75,6320 h60
  text "Top Layer - Bottom Layer" at 844.55,6320 h60
  text "Pad" at 2344.1,6320 h60
  text "(Mixed)" at 2933.95,6320 h60
  text "(Mixed)" at 3679.75,6320 h60
  text "17" at -2124.64,6170 h60
  text "59.06mil (1.500mm)" at -1534.79,6170 h60
  text "PTH" at -395.13,6170 h60
  text "Round" at 110.75,6170 h60
  text "Top Layer - Bottom Layer" at 844.55,6170 h60
  text "Pad" at 2344.1,6170 h60
  text "(Mixed)" at 2933.95,6170 h60
  text "(Mixed)" at 3679.75,6170 h60
  text "141" at -2124.64,6020 h60
  text "11.81mil (0.300mm)" at -1534.79,6020 h60
  text "PTH" at -395.13,6020 h60
  text "Round" at 110.75,6020 h60
  text "Top Layer - Bottom Layer" at 844.55,6020 h60
  text "Via" at 2344.1,6020 h60
  text "Rounded" at 2933.95,6020 h60
  text "v60h30m0mx0" at 3679.75,6020 h60
  text "199 Total" at -2124.64,5870 h60
  text "Slot definitions :" at -2630.51,5725.03 h60
  text "Routed Path Length" at -1597.82,5725.03 h60
  text "= Calculated from tool start centre position to tool end centre position." at -495.16,5725.03 h60
  text "Hole Length" at -1597.82,5625.05 h60
  text "= Routed Path Length + Tool Size = Slot length as defined in the PCB layout" at -905.02,5625.05 h60

## Dimensions
3543.31,0 to 3543.31,4724.41 on Dimensions
0,4724.9 to 3543.31,4724.9 on Dimensions